# EAGLE board rules_and_autorouter (EAGLE 9.6.2)

No outline drawn. Coordinates in mm, seen from the top.
Copper layers (1*16): Top 0.035mm / Bottom
Design rules "fab-one": minimum track width 6mil, minimum drill 0.3mm, track to track 8mil, track to pad 10mil, minimum pad ring 10mil
Net classes: 1 power: width 0.5 mm, drill 0.4 mm, clearance 0.3 mm to class 0, clearance 0.4 mm; 2 fast: width 0.2 mm, drill 0.3 mm

## Placement (x,y rotation side)
R1  1k  [R0805]  8,10 0 top

## Library data of the parts
R1 = hand